# Altium PCB PCB1.PcbDoc
Units mil, origin at the board's own origin, x right, y up, seen from the top; angles counter-clockwise.
Board outline 2795 x 2930 mil, 2 copper layers (Top Layer, Bottom Layer); 38 components, 23 nets, 145 pads, 17 vias.
Unrouted connection lines stored in the file: 10.
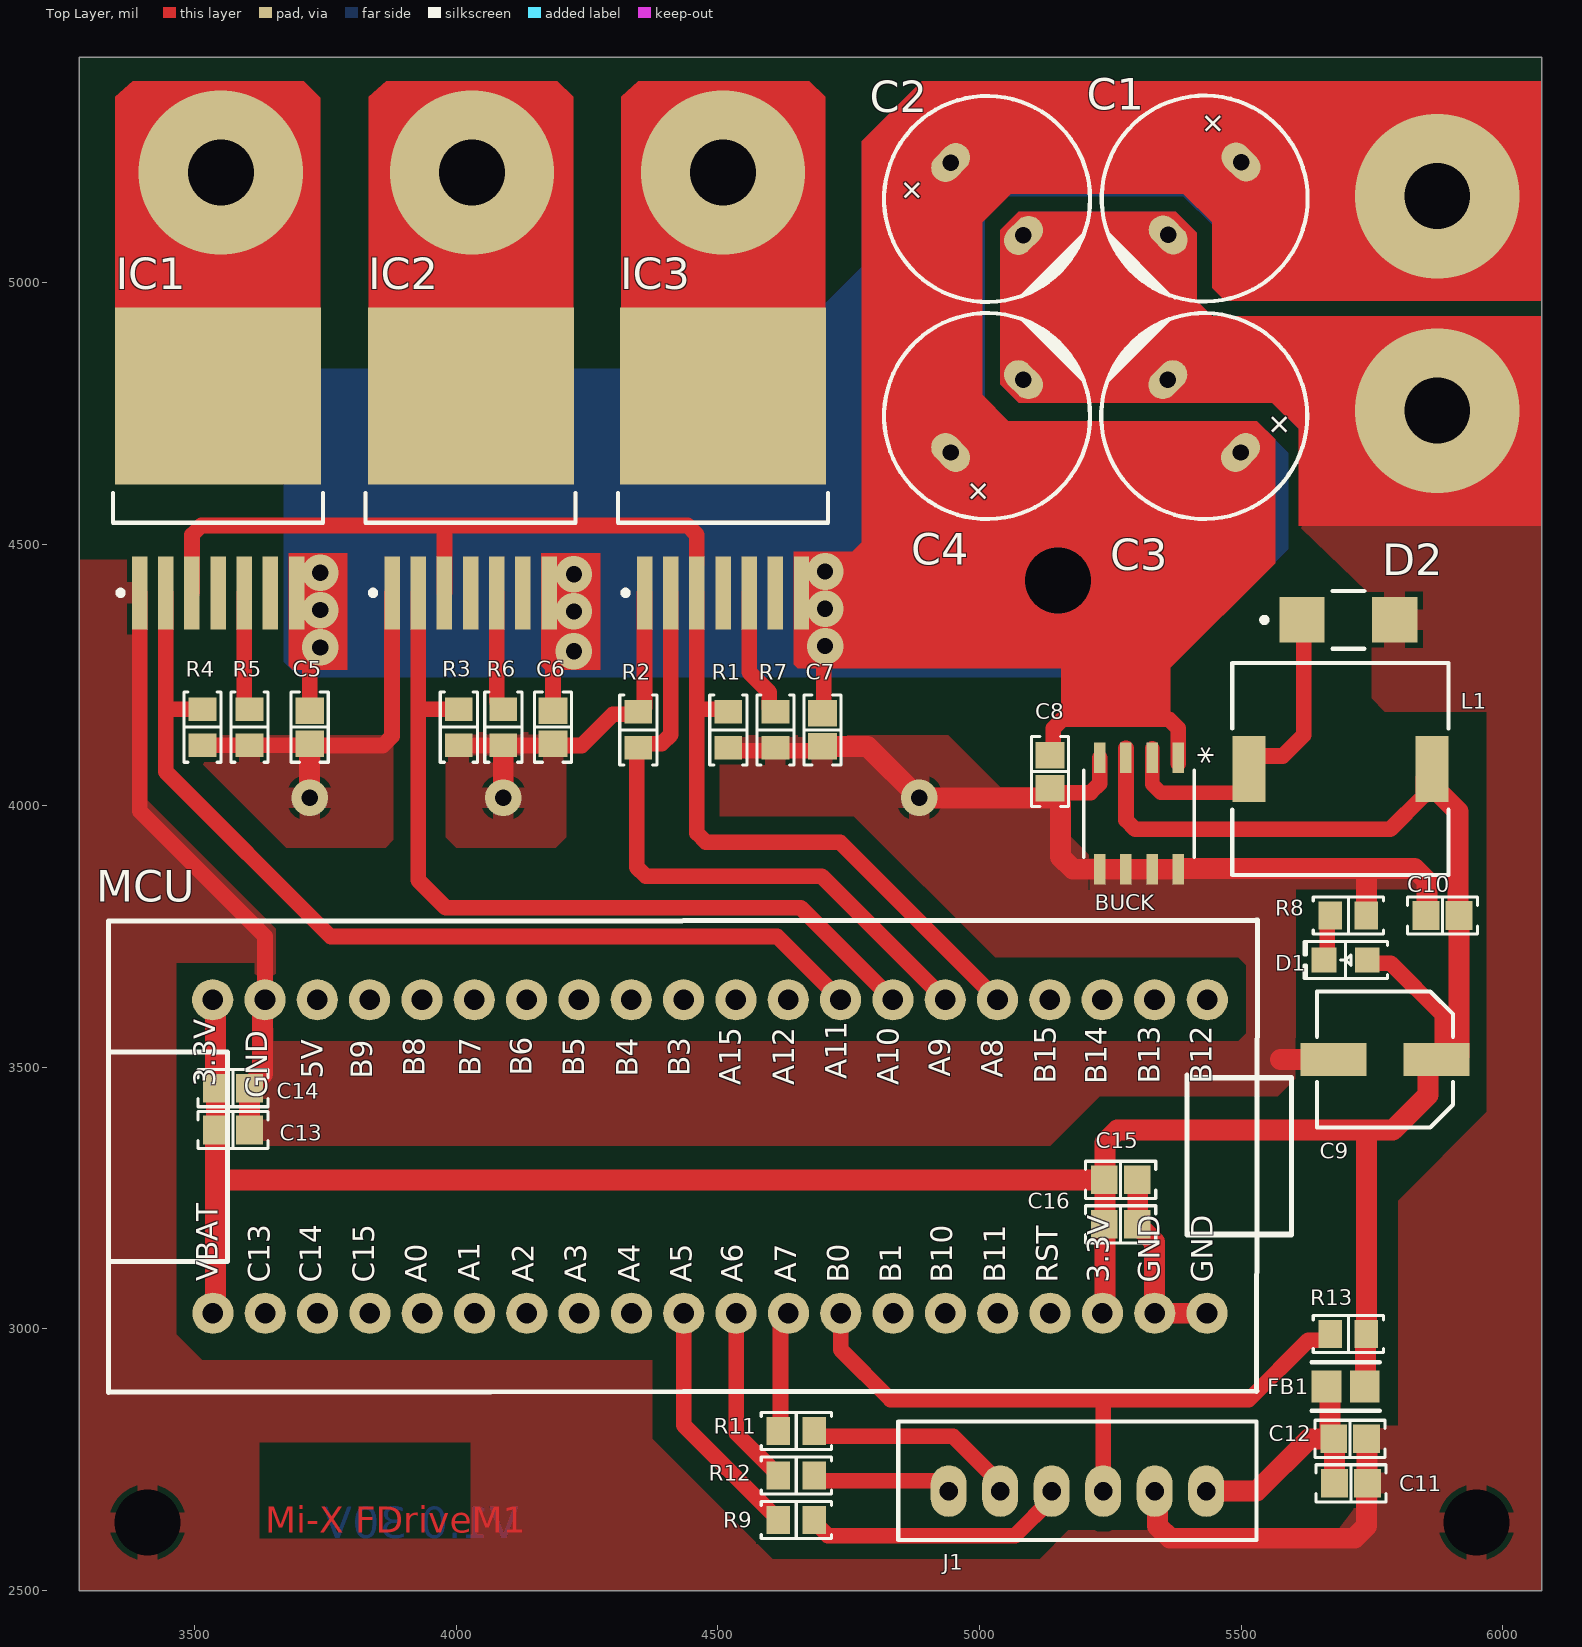
[diagram p0: Top Layer view]
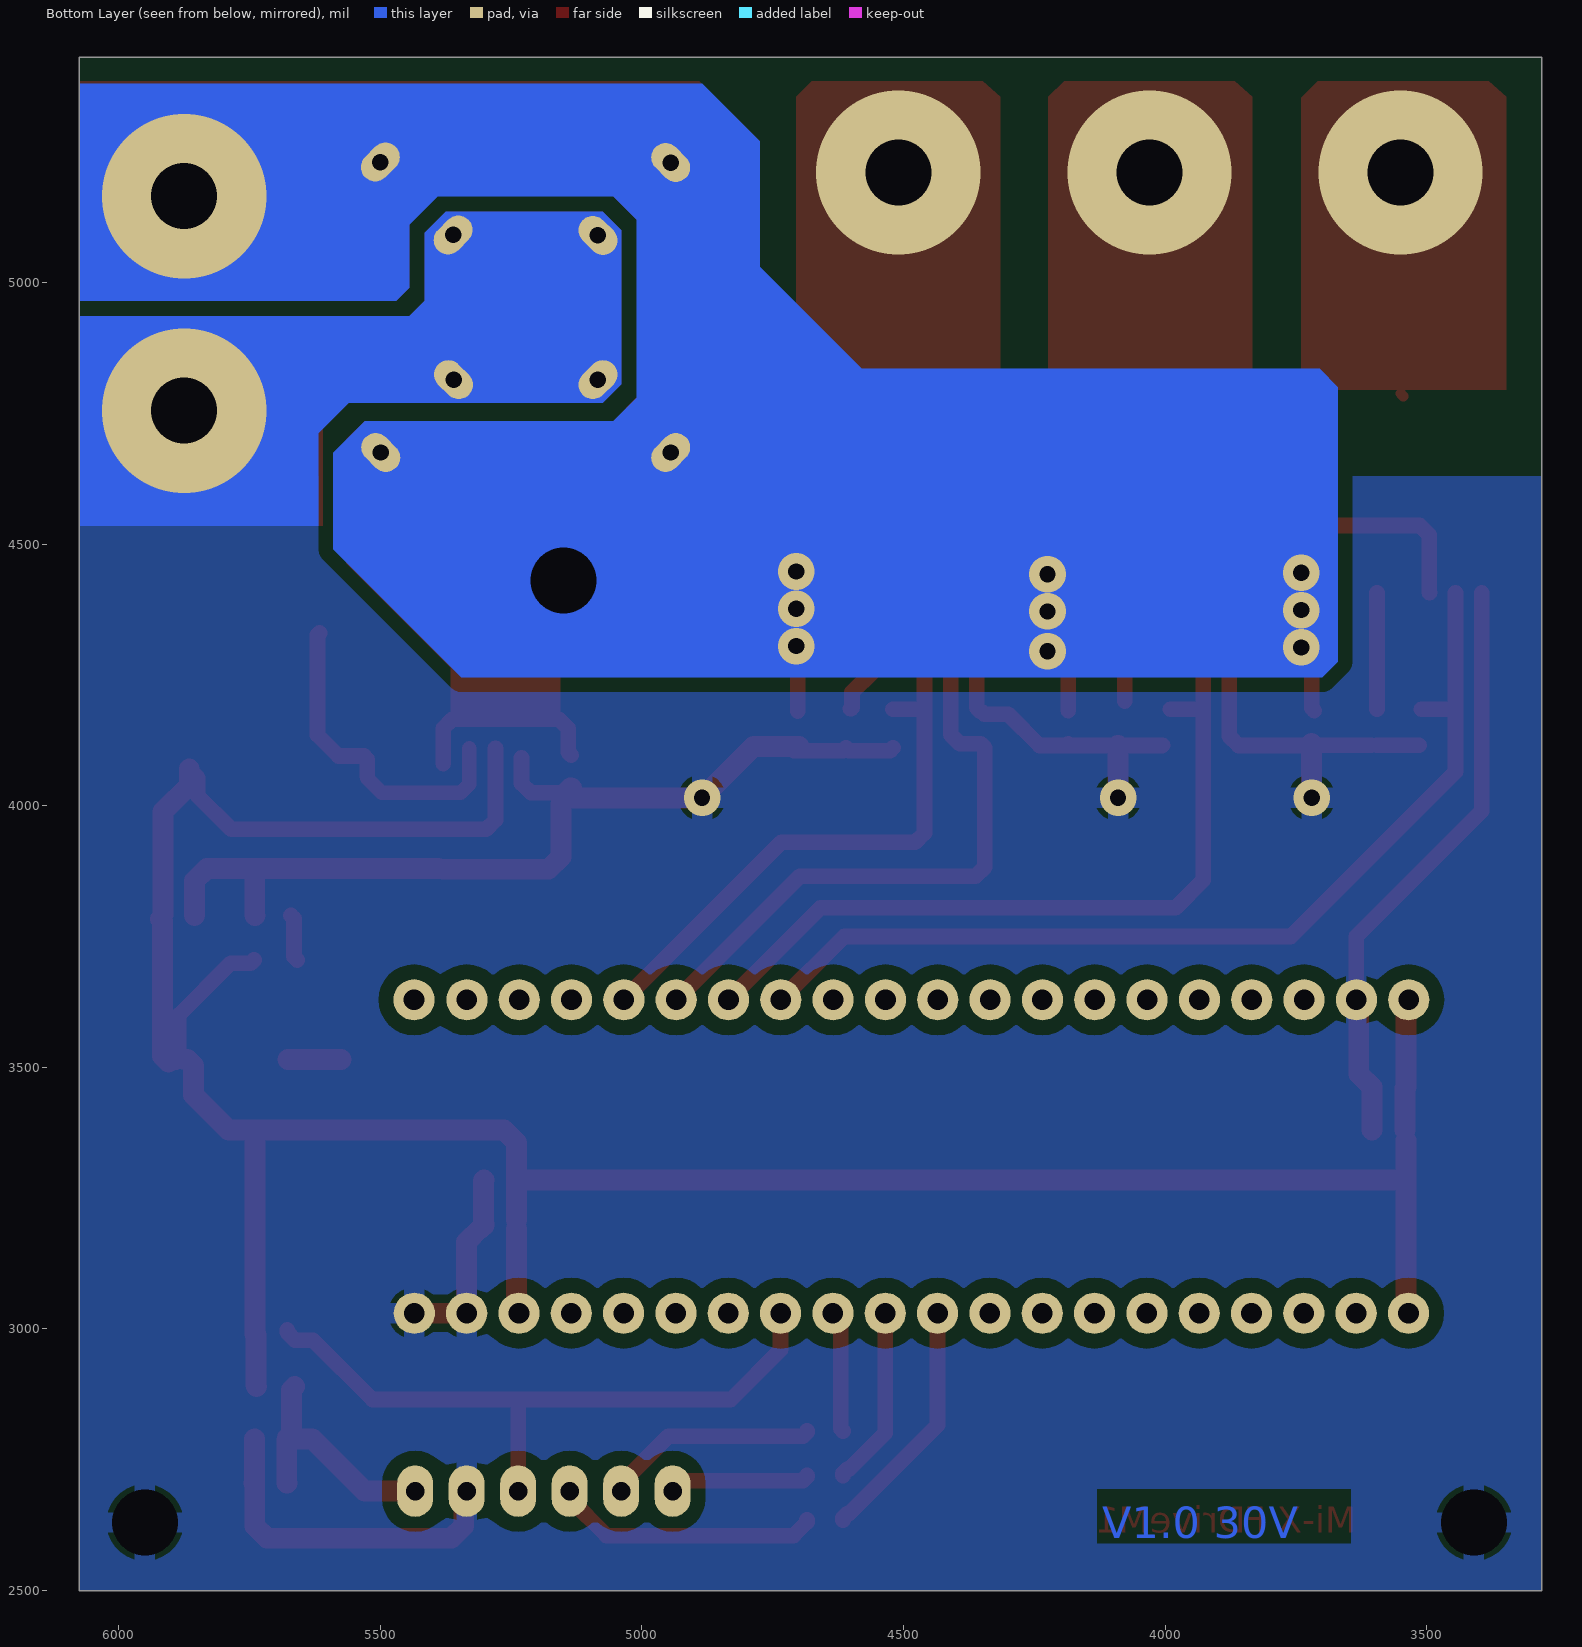
[diagram p1: Bottom Layer view, seen from below]
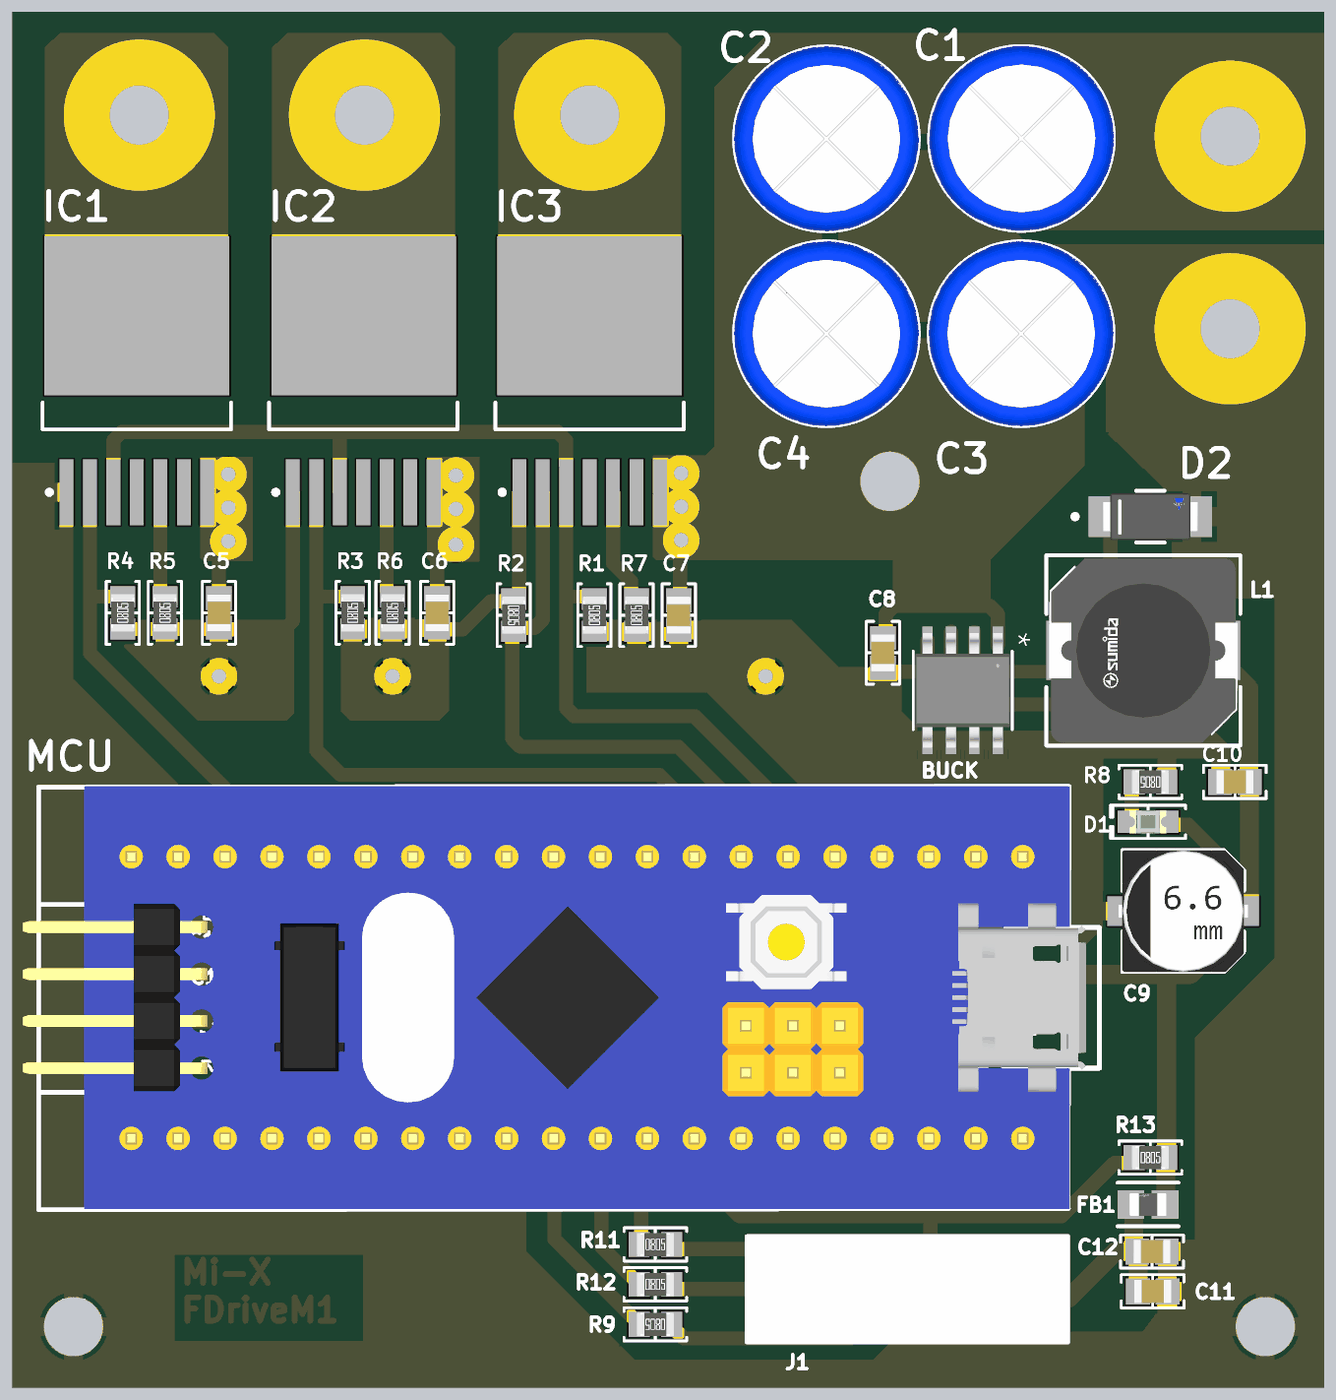
[diagram p2: 3D render of the assembled board from above, using the file's embedded part models]

## Layer stack, top to bottom
Top Solder: solder mask 0.4, Solder Resist, Dk 3.5
Top Layer: signal copper 1.4
Dielectric 1: dielectric 12.6, FR-4, Dk 4.8
Bottom Layer: signal copper 1.4
Bottom Solder: solder mask 0.4, Solder Resist, Dk 3.5

## Board outline
3280,2500 6075,2500 6075,5430 3280,5430

## Design rules (kind name [scope] priority, off if disabled: settings)
Clearance [All] p1: gap=28 ignorepadtopadclearanceinfootprint=FALSE except(0: Arc-Hole Track-Hole SMDPad-Hole THPad-Hole Via-Hole Fill-Hole Poly-Hole Region-Hole Text-Hole; 10: Arc-SMDPad Arc-THPad Arc-Text Track-SMDPad Track-THPad Track-Text SMDPad-SMDPad SMDPad-THPad SMDPad-Text THPad-THPad THPad-Text Via-Text Fill-Text Poly-Text Region-Text Text-Text; 20: Arc-Arc Arc-Track Arc-Via Track-Track Track-Via SMDPad-Via SMDPad-Fill SMDPad-Poly SMDPad-Region THPad-Via Via-Via)
PolygonConnect [All] p1: connectstyle=Relief reliefconductorwidth=40 reliefentries=4 polygonreliefangle="90 Angle" airgapwidth=10
RoutingVias [All] p1: holewidth=31 width=60 viastyle="Through Hole" minholewidth=30 minwidth=59 maxholewidth=500 maxwidth=500
SolderMaskExpansion [All] p1: expansion=4 istentingtop=FALSE
Width [All] p1: maxlimit=500 minlimit=10 preferedwidth=40
30 further rules are at their usual default settings.

## Components (designator, comment, footprint, x,y, rotation, side; value= is the part's Value field where it differs from the comment)
BUCK "XL1509-ADJ" SOIC-8_YTS 5305,3985 r270 top
C1 "470 µF" "CAP TH ALPOLY D10.00mm S5.00mm H11.50mm" 5430.4,5160.4 r45 top
C2 "470 µF" "CAP TH ALPOLY D10.00mm S5.00mm H11.50mm" 5014.6,5159.6 r135 top
C3 "470 µF" "CAP TH ALPOLY D10.00mm S5.00mm H11.50mm" 5429.6,4744.6 r315 top
C4 "470 µF" "CAP TH ALPOLY D10.00mm S5.00mm H11.50mm" 5014.6,4744.6 r225 top
C5 "10000 pF" "CAP 0805_2012" 3720,4150 r90 top
C6 "10000 pF" "CAP 0805_2012" 4185,4150 r90 top
C7 "10000 pF" "CAP 0805_2012" 4700,4145 r90 top
C8 "10000 pF" "CAP 0805_2012" 5135,4065 r90 top
C9 "100uF" "CAP ALSMD 6.6MM H8.0MM" 5775,3515 r180 top
C10 "100uF" "CAP 0805_2012" 5885,3790 r0 top value="10000 pF"
C11 "10000 pF" "CAP 0805_2012" 5710,2705 r180 top
C12 "10000 pF" "CAP 0805_2012" 5708.5,2790 r180 top
C13 "10000 pF" "CAP 0805_2012" 3573.5,3380 r180 top
C14 "10000 pF" "CAP 0805_2012" 3573.5,3460 r180 top
C15 "10000 pF" "CAP 0805_2012" 5270,3285 r180 top
C16 "10000 pF" "CAP 0805_2012" 5270,3200 r180 top
D1 "Green" "LED 0805_2012 GREEN" 5700,3705 r180 top
D2 "SS26" FP-S8-V-3848_01-003-MFG 5705,4355 r0 top
FB1 "100ohm" FP-BLM21-0_2-t0_85-e0_5-IPC_A 5700,2890 r180 top
IC1 "BTN8982TA" INF-PG-TO263-7-1_L#1 3545,4645 r90 top
IC2 "BTN8982TA" INF-PG-TO263-7-1_L#2 4027.5,4645 r90 top
IC3 "BTN8982TA" INF-PG-TO263-7-1_L#1 4510,4645 r90 top
J1 "Encoder" "JST XH B6B-XH-A" 5187.36,2690 r180 top
L1 "68uH" FP-CDRH104R-MFG 5690,4070 r90 top
MCU "STM32F103C8T6" "Stm32 BluePill" 4258.07,3320.8 r90 top
R1 "10k" "RES 0805_2012" 4520,4145 r90 top
R2 "10k" "RES 0805_2012" 4348,4145 r270 top
R3 "10k" "RES 0805_2012" 4005,4150 r90 top
R4 "10k" "RES 0805_2012" 3515,4150 r90 top
R5 "4.7K" "RES 0805_2012" 3605,4150 r90 top
R6 "4.7K" "RES 0805_2012" 4090,4150 r90 top
R7 "4.7K" "RES 0805_2012" 4610,4145 r90 top
R8 "470R" "RES 0805_2012" 5705,3790 r180 top
R9 "22R" "RES 0805_2012" 4650,2635 r180 top
R11 "22R" "RES 0805_2012" 4650,2805 r0 top
R12 "22R" "RES 0805_2012" 4650,2720 r0 top
R13 "4.7K" "RES 0805_2012" 5705,2990 r0 top

## Footprints (in the part's own frame and the unit in brackets; to place one, negate y for a bottom-side part, rotate by r counter-clockwise, add the part's x,y. Pads: shape width x height; smd on the part's side, far side on the other; paste and mask are expansions set on the pad)
"CAP 0805_2012" [mm] "Chip Capacitor, 2-Leads, Body 2.00x1.20mm, IPC Medium Density"
  rect 1.3x1.4 smd: 1(-0.8,0) 2(0.8,0)
  silkscreen extent -1.7,-0.9 1.7,0.9, body extent -1,-0.64 1,0.64, height 1.26
"CAP ALSMD 6.6MM H8.0MM" [mm] "Aluminum Electrolytic Capacitor, Body 6.60x6.60x8.0mm, IPC Low Density"
  rect 3.2x1.6 smd: 1(-2.5,0) 2(2.5,0)
  silkscreen extent -3.3,-3.3 3.3,3.3, body extent -3.5,-3.3 3.5,3.3, height 8
"CAP TH ALPOLY D10.00mm S5.00mm H11.50mm" [mm] "10.00mm Diameter 11.50mm Lead Spacing Aluminum - Polymer Capacitors Radial, Can"
  oval 1.4x2.1 hole 0.8: 1(2.5,0) 2(-2.5,0)
  silkscreen extent -5,-5 5,5, body extent -5.01,-5 5,5, height 11.5
FP-BLM21-0_2-t0_85-e0_5-IPC_A [mil]
  rect 57.28x61.27 smd paste+0 mask+0: 1(-36.44,0) 2(36.44,0)
  silkscreen extent -65,-46 65,46, body extent -85,-50 85,50, height 10
FP-CDRH104R-MFG [mm]
  rect 3.2x1.6 smd paste+0 mask+0: 1(0,4.45) 2(0,-4.45)
  silkscreen extent -5.15,-5.25 5.15,5.25, body extent -5.25,-5.35 5.25,5.35, height 0.25
FP-S8-V-3848_01-003-MFG [mm]
  rect 2.2x2.21 smd paste+0 mask+0: 1(-2.25,0) 2(2.25,0)
  silkscreen extent -4.2,-1.4 0.77,1.4, body extent -3.45,-1.5 3.45,1.5, height 0.25
INF-PG-TO263-7-1_L#1 [mm] "DPAK, 8-Leads, Body 10x9.25mm, Pitch 1.27mm, IPC High Density"
  rect 3.55x0.75 smd: 1(-6.05,3.81) 2(-6.05,2.54) 3(-6.05,1.27) 4(-6.05,0) 5(-6.05,-1.27) 6(-6.05,-2.54) 7(-6.05,-3.81)
  rect 8.6x10 smd: 8(3.5,0)
  silkscreen extent -6.17,-5.1 -1.2,5.1, body extent -2.65,-5.1 6.8,5.1, height 4.4
INF-PG-TO263-7-1_L#2 [mm] "DPAK, 8-Leads, Body 10x9.25mm, Pitch 1.27mm, IPC High Density"
  rect 3.55x0.75 smd: 1(-6.05,3.81) 2(-6.05,2.54) 3(-6.05,1.27) 4(-6.05,0) 5(-6.05,-1.27) 6(-6.05,-2.54) 7(-6.05,-3.81)
  rect 8.6x10 smd: 8(3.5,-0.025)
  silkscreen extent -6.17,-5.1 -1.2,5.1, body extent -2.65,-5.1 6.8,5.1, height 4.4
"JST XH B6B-XH-A" [mm]
  oval 1.75x2.5 hole 0.9: 1(-6.25,0) 2(-3.75,0) 3(-1.25,0) 4(1.25,0) 5(3.75,0) 6(6.25,0)
  silkscreen extent -8.7,-3.38 8.7,2.38, body extent -8.7,-3.38 8.7,2.38, height 7
"LED 0805_2012 GREEN" [mm] "Chip Diode, 2-Leads, Body 2.00x1.25mm, IPC Medium Density"
  rect 1.2x1.2 smd: 1(-1.05,0) 2(1.05,0)
  silkscreen extent -2.03,-0.9 2.03,0.9, body extent -1,-0.62 1,0.63, height 0.9
"RES 0805_2012" [mm] "Chip Resistor, 2-Leads, Body 2.00x1.25mm, IPC Medium Density"
  rect 1.15x1.35 smd: 1(-0.875,0) 2(0.875,0)
  silkscreen extent -1.7,-0.9 1.7,0.9, body extent -1,-0.62 1,0.63, height 0.6
SOIC-8_YTS [mil]
  rect 59x22 smd paste+0 mask+0: 1(-106.5,75) 2(-106.5,25) 3(-106.5,-25) 4(-106.5,-75) 5(106.5,-75) 6(106.5,-25) 7(106.5,25) 8(106.5,75)
  silkscreen extent -84,-106 84,106, body extent -122,-101 122,101, height 69
"Stm32 BluePill" [mm]
  round 2 hole 1: 1(7.828,-29.909) 2(7.828,-27.343) 3(7.828,-24.803) 4(7.828,-22.263) 5(7.828,-19.723) 6(7.828,-17.183) 7(7.828,-14.643) 8(7.828,-12.103) 9(7.828,-9.563) 10(7.828,-7.023) 11(7.828,-4.483) 12(7.828,-1.943) 13(7.828,0.597) 14(7.828,3.137) 15(7.828,5.677) 16(7.828,8.217) 17(7.828,10.757) 18(7.828,13.297) 19(7.828,15.837) 20(7.828,18.377) 21(-7.386,18.366) 22(-7.386,15.826) 23(-7.386,13.286) 24(-7.386,10.746) 25(-7.386,8.206) 26(-7.386,5.666) 27(-7.386,3.126) 28(-7.386,0.586) 29(-7.386,-1.954) 30(-7.386,-4.494) 31(-7.386,-7.034) 32(-7.386,-9.574) 33(-7.386,-12.114) 34(-7.386,-14.654) 35(-7.386,-17.194) 36(-7.386,-19.734) 37(-7.386,-22.274) 38(-7.386,-24.814) 39(-7.386,-27.354) 40(-7.386,-29.894)
  silkscreen extent -11.22,-34 11.69,23.43, body extent -11.18,-33.27 11.68,24.29, height 12.31

## Part data
BUCK: "Description", Manufacturer_Name="UMW(Youtai Semiconductor Co., Ltd.)", Copyright="Copyright (C) 2026 Ultra Librarian. All rights reserved.", Manufacturer_Part_Number=XL1509-ADJ, RefDes=RefDes, Type=Type
C1 C2 C3 C4: library part APSC160ELL471MJB5S, "CAP ALUM POLY 470UF 20% 16V T/H", Device Package="Radial, Can", ESR (Equivalent Series Resistance)=10mOhm, Lifetime @ Temp.="2000 Hrs @ 105°C", Manufacturer="United Chemi-Con", Operating Temperature="-55°C ~ 105°C", Ripple Current @ High Frequency="6.1 A @ 100 kHz", Supplier Part Number 1=565-3234-ND, Tolerance=±20%, Voltage - Rated="16 V", Applications="General Purpose", Capacitance="470 µF", ComponentLink1Description=Datasheet, ComponentLink1URL=http://www.chemi-con.co.jp/cgi-bin/CAT_DB/SEARCH/cat_db_al.cgi?e=e&j=p&pdfname=psc, ComponentLink2Description="DigiKey Link", ComponentLink2URL=https://www.digikey.com/en/products/detail/united-chemi-con/APSC160ELL471MJB5S/1826698, Height - Seated (Max)="0.453\" (11.50mm)", lastupdated="4/5/2026 21:04:37", Lead Spacing="0.197\" (5.00mm)", Lifecycle Status=Active, Minimum Order=1, Mounting Type="Through Hole", Package / Case="Radial, Can", packaging=Bulk, Part Number=APSC160ELL471MJB5S, Part Status=Active, partid=3587, price=0.89, series=NPCAP™-PSC, Size / Dimension="0.394\" Dia (10.00mm)", Supplier 1=DigiKey, Type=Polymer
C5 C6 C7 C11 C13 C15: library part C0805C103K5RACTU, "CAP CER 10000PF 50V X7R 0805", Capacitance=100nF, Device Package="0805 (2012 Metric)", Manufacturer=KEMET, Operating Temperature="-55°C ~ 125°C", Supplier Part Number 1=399-C0805C103K5RACTUCT-ND, Temperature Coefficient=X7R, Tolerance=±10%, Voltage - Rated=50V, Applications="Bypass, Decoupling", ComponentLink1Description=Datasheet, ComponentLink1URL=https://api.kemet.com/component-edge/download/datasheet/C0805C103K5RACTU.pdf, ComponentLink2Description="DigiKey Link", ComponentLink2URL=https://www.digikey.com/en/products/detail/kemet/C0805C103K5RACTU/411157, lastupdated="4/6/2026 19:33:13", Lifecycle Status=Active, Minimum Order=1, Mounting Type="Surface Mount, MLCC", Package / Case="0805 (2012 Metric)", packaging=TapeAndReel, Part Number=C0805C103K5RACTU, Part Status=Active, partid=74789, price=0.01, series="SMD Comm X7R", Size / Dimension="0.079\" L x 0.049\" W (2.00mm x 1.25mm)", Supplier 1=DigiKey, Thickness (Max)="0.035\" (0.88mm)"
C8 C10: library part C0805C103K5RACTU, "CAP CER 10000PF 50V X7R 0805", Capacitance=1uF, Device Package="0805 (2012 Metric)", Manufacturer=KEMET, Operating Temperature="-55°C ~ 125°C", Supplier Part Number 1=399-C0805C103K5RACTUCT-ND, Temperature Coefficient=X7R, Tolerance=±10%, Voltage - Rated=50V, Applications="Bypass, Decoupling", ComponentLink1Description=Datasheet, ComponentLink1URL=https://api.kemet.com/component-edge/download/datasheet/C0805C103K5RACTU.pdf, ComponentLink2Description="DigiKey Link", ComponentLink2URL=https://www.digikey.com/en/products/detail/kemet/C0805C103K5RACTU/411157, lastupdated="4/6/2026 19:33:13", Lifecycle Status=Active, Minimum Order=1, Mounting Type="Surface Mount, MLCC", Package / Case="0805 (2012 Metric)", packaging=TapeAndReel, Part Number=C0805C103K5RACTU, Part Status=Active, partid=74789, price=0.01, series="SMD Comm X7R", Size / Dimension="0.079\" L x 0.049\" W (2.00mm x 1.25mm)", Supplier 1=DigiKey, Thickness (Max)="0.035\" (0.88mm)"
C9: library part EHBSA035M1010608T, "CAP ALUM HYBRID 0608 35V 100UF", Part Number=EHBSA035M1010608T
C12 C14 C16: library part C0805C103K5RACTU, "CAP CER 10000PF 50V X7R 0805", Capacitance=10uF, Device Package="0805 (2012 Metric)", Manufacturer=KEMET, Operating Temperature="-55°C ~ 125°C", Supplier Part Number 1=399-C0805C103K5RACTUCT-ND, Temperature Coefficient=X7R, Tolerance=±10%, Voltage - Rated=50V, Applications="Bypass, Decoupling", ComponentLink1Description=Datasheet, ComponentLink1URL=https://api.kemet.com/component-edge/download/datasheet/C0805C103K5RACTU.pdf, ComponentLink2Description="DigiKey Link", ComponentLink2URL=https://www.digikey.com/en/products/detail/kemet/C0805C103K5RACTU/411157, lastupdated="4/6/2026 19:33:13", Lifecycle Status=Active, Minimum Order=1, Mounting Type="Surface Mount, MLCC", Package / Case="0805 (2012 Metric)", packaging=TapeAndReel, Part Number=C0805C103K5RACTU, Part Status=Active, partid=74789, price=0.01, series="SMD Comm X7R", Size / Dimension="0.079\" L x 0.049\" W (2.00mm x 1.25mm)", Supplier 1=DigiKey, Thickness (Max)="0.035\" (0.88mm)"
D1: library part QTLP630C4TR, "LED GREEN CLEAR 0805 SMD", Current - Test=20mA, Device Package="0805 (2012 Metric)", Lens Color=Colorless, Manufacturer="Everlight Electronics Co Ltd", Millicandela Rating=10mcd, Supplier Device Package=0805, Supplier Part Number 1=1080-1411-1-ND, Voltage - Forward (Vf) (Typ)=2.1V, Color=Green, ComponentLink1Description=Datasheet, ComponentLink1URL=//media.digikey.com/PDF/Data%20Sheets/Everlight%20PDFs/QTLP630-2.pdf, ComponentLink2Description="DigiKey Link", ComponentLink2URL=https://www.digikey.com/en/products/detail/everlight-electronics-co-ltd/QTLP630C4TR/2675902, Configuration=Standard, Height (Max)=1.20mm, lastupdated="4/5/2026 20:39:04", Lens Size="1.40mm x 1.25mm", Lens Style="Rectangle with Flat Top", Lens Transparency=Clear, Lifecycle Status=Active, Minimum Order=1, Mounting Type="Surface Mount", Package / Case="0805 (2012 Metric)", packaging=TapeAndReel, Part Number=QTLP630C4TR, Part Status=Active, partid=240, price=0.05, series=-, Size / Dimension="2.00mm L x 1.25mm W", Supplier 1=DigiKey, Viewing Angle=140°, Wavelength - Dominant=570nm, Wavelength - Peak=565nm
D2: library part CMP-02539-000064-1, "DIODE SCHOTTKY 60V 2A DO214AC", RoHS Compliant=Yes
FB1: library part CMP-06046-002791-1, "Chip Ferrite Bead, 0805, 420Ω @ 100MHz, 0.3Ω, 25%, 300mA"
IC1 IC2 IC3: library part CMP-1114-00014-1, "High Current PN Half Bridge, 5.5 to 40 V, 7 uA Iq, PG-TO263-7, Reel, Green", Manufacturer=Infineon, Operating Range="5.5 to 40 V", ComponentLink1Description="Manufacturer URL", ComponentLink1URL=http://www.infineon.com/, ComponentLink2Description=Datasheet, ComponentLink2URL=http://www.infineon.com/dgdl/BTN8982TA-Data-Sheet-rev10-Infineon.pdf?folderId=db3a30431ff98815012060aedcd46179&fileId=db3a30433fa9412f013fbe32289b7c17, ComponentLink3Description="Package Specification", ComponentLink3URL=http://www.infineon.com/dgdl/BTN8982TA-Data-Sheet-rev10-Infineon.pdf?folderId=db3a30431ff98815012060aedcd46179&fileId=db3a30433fa9412f013fbe32289b7c17&ack=t, DatasheetVersion="Rev. 1.0", Diagnosis="OT, OC-failure flag, current sense", Green=TRUE, Group=NovalithIC, Halogen-free=TRUE, ID(lim)="77 A", ID(lim) (min)="55 A", Inhibit=TRUE, Iq (typ)="7 uA", Mounting=SMT, Mounting Technology="Surface Mount", PackageDescription="7-Pin Plastic (Green) Transistor Single Outline Package, 9.25 x 10 mm Body, 1.27 mm Pitch", PackageReference=PG-TO263-7-1, PackageVersion=May-07, Packing=Reel, PartNumber=BTN8982TA, Protect="UV, OT, OC", RDS (on)=10
J1: library part B6B-XH-A(LF)(SN), "CONN HEADER VERT 6POS 2.5MM", Current Rating (Amps)=3A, Insulation Color=Natural, Manufacturer="JST Sales America Inc.", Material Flammability Rating="UL94 V-0", Operating Temperature="-25°C ~ 85°C", Supplier Part Number 1=455-2271-ND, Voltage Rating=250V, ComponentLink1Description=Datasheet, ComponentLink1URL=http://www.jst-mfg.com/product/pdf/eng/eXH.pdf, ComponentLink2Description="DigiKey Link", ComponentLink2URL=http://digikey.com/product-detail/en/jst-sales-america-inc/B6B-XH-A-LF-SN/455-2271-ND/1000381, Connector Type=Header, Contact Finish - Mating=Tin, Contact Finish - Post=Tin, Contact Length - Post="0.134\" (3.40mm)", Contact Material=Brass, Contact Shape=Square, Contact Type="Male Pin", Fastening Type="Detent Lock", Insulation Height="0.276\" (7.00mm)", Insulation Material="Polyamide (PA66), Nylon 6/6", lastupdated="1/12/2020 23:46:58", Lifecycle Status=Active, Minimum Order=1, Mounting Type="Through Hole", Number of Positions=6, Number of Positions Loaded=All, Number of Rows=1, packaging=Bulk, Part Number=B6B-XH-A(LF)(SN), Part Status=Active, partid=71, Pitch - Mating="0.098\" (2.50mm)", price=0.27, series=XH, Shrouding="Shrouded - 4 Wall", Style="Board to Cable/Wire", Supplier 1=DigiKey, Termination="Press-Fit, Solder"
L1: library part CMP-48855-000006-1, "FIXED IND 5.2UH 6A 22 MOHM SMD", Case/Package=Nonstandard, Current Rating=5.4A, DC Resistance (DCR)=22mR, Inductance=5.2uH, Max Operating Temperature=100°C, Min Operating Temperature=-40°C, Package Quantity=1, Rated Current-Max=5.5A, Saturation Current=5.6A, Test Frequency=100kHz, Tolerance=30%, Core Material=Ferrite, DC Current=5.4A, Depth=10.3mm, Height=4mm, Height - Seated (Max)=0.157inch, Lead Free="Lead Free", Length=10.5mm, Max DC Current=5.4A, Military Standard=Not, Mount="Surface Mount", packaging="Tape and Reel", Radiation Hardening=No, series=CDRH, Shielding=Shielded, Termination=SMD/SMT, Width=0.394inch
MCU: library part BluePill, "Designed By @Alixahedi"
R1 R2 R3 R4 R5 R6 R7 R8 R9 R11 R12 R13: library part CRGP0805F470R, "RES 470 OHM 1% 1/3W 0805", Part Number=CRGP0805F470R

## Free pads (board coordinates)
  round 60 hole 126: 4(3410,2630) 4(5150,4430) 4(5950,2630)

## Via types
v1: diameter 70, hole 31, Top Layer to Bottom Layer, 12 vias
v2: diameter 314, hole 126, Top Layer to Bottom Layer, 5 vias

## Nets (pads, with @x,y where several pads share a name; then routed paths per layer and width w, separated by ;. In a path a pad name is that pad's centre, name@x,y a point inside that pad or via, vN(x,y) a via of type N, cw(c..) or ccw(c..) an arc to the next point about the centre after c; other vN are vias at no path point)
3.3FLT: C11.2 C12.2 FB1.2 J1.1 | length 476.5
  Top Layer w40: J1.1 5530,2690 5630,2790 C12.2 ; FB1.2 5670,2883.56 5670,2798.98 5677.01,2791.97 C12.2 ; C11.2 5678.82,2705.32 5678.82,2788.19 C12.2
CSN: J1.3 MCU.33 R13.1 | length 1548.6
  Top Layer w30: MCU.33 4735,2960 4830,2865 5236.57,2865 ; J1.3 5236.57,2850 ; R13.1@5678.1,2998.1 5678.1,2993.61 5662.91,2978.43 5628.43,2978.43 5515,2865 ; 5236.57,2865 5500,2865 5515,2865 ; 5236.57,2865 5515,2865
EN: IC1.3 IC2.3 IC3.3 MCU.5 R1.2 | length 2504.3
  Top Layer w30: IC1.3 3495.24,4407.05 3495.24,4517.43 3513.31,4535.5 3969.5,4535.5 ; IC2.3 3977.5,4527.5 3969.5,4535.5 ; IC3.3 4460,4184.45 ; IC3.3@4460,4461.46 4459.76,4461.69 4459.76,4517.93 4442.19,4535.5 3969.5,4535.5 ; R1.2@4520,4184.45 4460,4184.45 ; MCU.5 4733.57,3930 4477.57,3930 4460,3947.57 4460,4184.45
GND: BUCK.4 BUCK.5 BUCK.6 BUCK.7 BUCK.8 C1.2 C2.2 C3.2 C4.2 C5.1 C6.1 C7.1 C8.1 C9.2 C10.1 C11.1 C12.1 C13.1 C14.1 C15.1 C16.1 D2.2 IC1.1 IC2.1 IC3.1 J1.2 MCU.19 MCU.39 MCU.40 pad.4@3410,2630 pad.4@5950,2630 R1.1 R2.1 R3.1 R4.1 R5.1 R6.1 R7.1 R8.1 | length 5534.1
  Top Layer w30: IC1.1 3395,3990 3634.57,3750.43 MCU.19 ; R4.1 R5.1@3595,4115.55 ; R5.1 C5.1@3720,4115.55 ; C5.1 3723.5,4115 3859.93,4115 3877.5,4132.57 IC2.1 ; R3.1 4005.55,4115 4089.45,4115 R6.1 4090.55,4115 4181.5,4115 C6.1 4188.5,4115 4240,4115 4299.8,4174.8 4345.35,4174.8 R2.1@4350,4179.45 ; R2.1@4352.36,4179.45 4360,4187.09 IC3.1 ; R1.1 4525.55,4105 4604.45,4105 R7.1 4615.55,4105 C7.1@4710,4105 ; C8.1@5136.97,4033.5 5142.56,4027.91 5145.47,4025 5212.43,4025 5230,4042.57 BUCK.4
  Top Layer w40: C13.1 C14.1 3605,3461.97 3630,3486.97 3630,3624.43 MCU.19 ; v1(3720,4015) 3720,4115.55 C5.1 ; v1(4090,4015) R6.1 ; C7.1 4786.5,4113.5 v1(4885,4015) C8.1@5131.97,4015 ; C8.1 C8.1@5136.97,4033.5 ; C8.1@5142.56,4027.91 5142.56,4016.92 5155,4004.48 5155,3901.93 5178.43,3878.5 BUCK.5 BUCK.6 BUCK.7 BUCK.8 ; C15.1 5302.56,3283.93 5302.56,3201.07 C16.1 5301.5,3198.03 5307.09,3192.44 5309.06,3192.44 5335,3166.5 MCU.39 MCU.40 ; J1.2 5340.53,2684.47 5340.53,2623.43 5363.96,2600 5716.57,2600 5740,2623.43 5740,2703.5 C11.1 5740.75,2705.75 5740.75,2789.25 C12.1 ; BUCK.8@5389,3880 5740,3880 ; 5575.28,3515 C9.2 ; R8.1 5740,3790.55 5740,3880 ; C10.1@5855,3790 5855,3856.57 5831.57,3880 5740,3880
  other v2: 5875,4755
IN1: IC1.2 MCU.8 R4.2 | length 1877
  Top Layer w30: IC1.2 3445,4184.45 ; R4.2@3510,4184.45 3445,4184.45 ; MCU.8 4613.57,3750 3760,3750 3445,4065 3445,4184.45
IN2: IC2.2 MCU.7 R3.2 | length 1615.8
  Top Layer w30: IC2.2 3927.5,4190 ; R3.2@3990,4184.45 3933.05,4184.45 3927.5,4190 ; MCU.7 4658.57,3805 3980,3805 3927.5,3857.5 3927.5,4190
IN3: IC3.2 MCU.6 R2.2 | length 1269.1
  Top Layer w30: IC3.2 4410,4135.76 4392.43,4118.19 4352.64,4118.19 4345,4110.55 4345,3882.57 4362.57,3865 4698.57,3865 MCU.6
MISO: MCU.31 R12.1 | length 345.4
  Top Layer w30: MCU.31 4535,2800.98 4604.41,2731.57 4607.91,2731.57 4615.55,2723.94 R12.1
MOSI: MCU.32 R11.1 | length 233.1
  Top Layer w30: R11.1 4620,2809.45 4620,3001.81 4635,3016.81 MCU.32
NetBUCK_2: BUCK.2 D2.1 L1.1 | length 628.4
  Top Layer w28: BUCK.2@5330,4110 5330,4041.4 5346.4,4025 5497.31,4025 5524.8,4052.5 L1.1@5524.8,4055.75
  Top Layer w30: L1.1@5524.8,4055.75 5524.8,4088.5 5531.3,4095 5579.8,4095 5620,4135.2 5620,4326.42 D2.1@5616.42,4330
NetD1_2: D1.2 R8.2 | length 89.9
  Top Layer w30: D1.2 5665,3711.34 5665,3784.45 R8.2
NetIC1_4: IC1.4 IC1.8 | length 7.1
  Top Layer w20: IC1.8 IC1.8@3550,4787.8
  other v2: 3550.2,5210.07
NetIC1_5: IC1.5 R5.2 | length 222.4
  Top Layer w30: R5.2@3595,4184.45 IC1.5
NetIC2_4: IC2.4 IC2.8
  other v2: 4030.1,5210.07
NetIC2_5: IC2.5 R6.2 | length 207.5
  Top Layer w30: R6.2@4077.26,4199.45 4077.26,4406.57 IC2.5
NetIC3_4: IC3.4 IC3.8
  other v2: 4510,5210.07
NetIC3_5: IC3.5 R7.2 | length 239.2
  Top Layer w30: IC3.5 4560,4255 4598.43,4216.57 4598.43,4187.09 4600.05,4185.46 R7.2@4601.35,4185.46
NetJ1_4: J1.4 R9.1 | length 512.3
  Top Layer w30: R9.1 4684.45,2631.06 4710.51,2605 5067.91,2605 5138.15,2675.24 J1.4
NetJ1_5: J1.5 R11.2 | length 412.9
  Top Layer w30: R11.2 4684.45,2802.64 4692.09,2795 4949.49,2795 5039.72,2704.76 J1.5
NetJ1_6: J1.6 R12.2 | length 271.9
  Top Layer w30: R12.2 4684.45,2717.64 4692.09,2710 4923.33,2710 4941.3,2692.03 J1.6
SCK: MCU.30 R9.2 | length 471.8
  Top Layer w30: MCU.30 4435,2815.98 4604.41,2646.57 4607.91,2646.57 4615.55,2638.94 R9.2
VCC: BUCK.3 C9.1 C10.2 C13.2 C14.2 C15.2 C16.2 D1.1 FB1.1 L1.2 MCU.20 MCU.21 MCU.38 R13.2 | length 5511.1
  Top Layer w30: 3534.79,3290 3539.79,3285 ; MCU.38 MCU.38@5240,3035 ; C16.2@5240,3191.5 C16.2@5240,3208.5 ; BUCK.3@5280,4110 BUCK.3 5280,3972.57 5297.57,3955 5785,3955 5848.7,4018.7 5848.7,4038.5 5848.7,4053.5 L1.2 ; D1.1 5747.45,3698.89 5786.11,3698.89 5885,3600 5885,3526.57 C9.1 ; C9.1@5879.24,3520.82 5890.06,3510 C9.1@5895,3510
  Top Layer w40: MCU.20 3540,3623.57 3540,3462.01 C14.2 C13.2 ; MCU.21 3539.79,3034.79 3539.79,3285 ; C13.2@3539.79,3360.56 3539.79,3285 ; C15.2@5235.2,3285 3539.79,3285 ; C15.2 5239.94,3286.43 5239.94,3356.57 5263.37,3380 5739.45,3380 5790,3380 5856.94,3446.94 5856.94,3503.5 5868.43,3515 C9.1 ; MCU.38@5240,3035 C16.2@5240,3191.5 ; C16.2@5240,3208.5 C15.2@5240,3279.97 ; FB1.1 5737.94,2891.49 5737.94,2988.49 R13.2 5739.45,3379.45 5740,3380 ; L1.2 5865.2,4053.5 5865.2,4038.5 5915,3988.7 5915,3791.5 C10.2 ; C9.1@5905,3510 5916.5,3521.5 5916.5,3780 C10.2@5920,3783.5
VDC: BUCK.1 C1.1 C2.1 C3.1 C4.1 C5.2 C6.2 C7.2 C8.2 IC1.7 IC2.7 IC3.7 pad.4@5150,4430 | length 735.5
  Top Layer w30: C5.2@3715,4181.5 3720,4186.5 3720,4271.68 3740,4291.68 v1(3740,4302.5) ; C6.2 4185,4275 ; v1@4225,4284.18 v1(4225,4295) ; C7.2@4702.5,4180.75 4702.5,4302.5 v1(4705,4305) ; C8.2 5140.86,4102.35 5140.86,4147.43 5158.43,4165 5362.43,4165 5380,4147.43 BUCK.1@5380,4080
  other v1: 4225,4371.25 3740,4373.75 4705,4376.25 4225,4442.5 3740,4445 4705,4447.5
  other v2: 5875,5165
pads on no net: IC1.6 IC2.6 IC3.6 MCU.1 MCU.2 MCU.3 MCU.4 MCU.9 MCU.10 MCU.11 MCU.12 MCU.13 MCU.14 MCU.15 MCU.16 MCU.17 MCU.18 MCU.22 MCU.23 MCU.24 MCU.25 MCU.26 MCU.27 MCU.28 MCU.29 MCU.34 MCU.35 MCU.36 MCU.37

## Polygon pours and split planes (outlines as drawn)
GND on Top Layer "GND_L01_P004" (solid, remove dead copper, pour order 4): 6075,4535 5610,4535 5750,4400 5750,4205 5775,4180 5970,4180 5970,3415 5800,3245 5800,2815 5715,2815 5715,2655 5685,2615 5170,2615 5115,2560 4605,2560 4375,2790 4375,2940 3515,2940 3465,2990 3465,3700 3615,3700 3615,3635 3640,3635 3655,3650 3655,3765 3400,4020 3400,4470 3280,4470 3280,2500 6075,2500
GND on Top Layer "GND_L01_P007" (solid, remove dead copper, pour order 7): 3490,4135 3490,4105 3675,3920 3865,3920 3880,3935 3880,4135
GND on Top Layer "GND_L01_P006" (solid, remove dead copper, pour order 6): 3980,4140 4210,4140 4210,3940 4190,3920 4000,3920 3980,3940
GND on Top Layer "GND_L01_P005" (solid, remove dead copper, pour order 5): 4495,4135 4939.99,4135 5039.99,4035 5165,4035 5165,3950 5220,3895 5840,3895 5840,3845 5835,3840 5605,3840 5605,3480 5570,3445 5230,3445 5135,3350 3610.59,3350 3610.59,3575 3650,3575 3650,3550 5495.01,3550 5510,3564.99 5510,3695 5495,3710 5030,3710 4760,3980 4495,3980
GND on Bottom Layer "GND_L02_P001" (solid, remove dead copper, pour order 1): 6075,4630 3280,4630 3280,2500 6075,2500

## Other copper
Top Layer:
  region net GND: 6075,4935 5445,4935 5415,4965 5415,5095 5375,5135 5075,5135 5040,5100 5040,4805 5075,4770 5560,4770 5610,4720 5610,4535 6075,4535
  region net VDC: 5365,4265 5365,4165 5155.97,4165 5155.97,4265
  region net VDC: 6075,5385 4890,5385 4775,5270 4775,4503 4757,4485 4757,4262.5 5364.06,4262.5 5565,4463.44 5565,4700 5530,4735 5055,4735 5005,4785 5005,5115 5060,5170 5390,5170 5445,5115 5445,4990 5470,4965 6075,4965
  region net VDC: 3680,4482.5 3792,4482.5 3792,4260 3687.5,4260 3680,4267.5
  region net VDC: 4645,4485 4757,4485 4757,4262.5 4652.5,4262.5 4645,4270
  region net VDC: 4163,4482 4275,4482 4275,4259.5 4170.5,4259.5 4163,4267
  region net NetIC1_4: 3348.34,4795 3348.34,5354.57 3381.66,5385 3708.34,5385 3740,5353.34 3740,4795
  region net NetIC3_4: 4315,4795 4315,5354.57 4348.32,5385 4675,5385 4705,5355 4705,4795
  region net NetIC2_4: 3833.34,4795 3833.34,5354.57 3866.66,5385 4193.34,5385 4223.34,5355 4223.34,4795
  text "Mi-X FDriveM1" at 3635,2610 h50
Bottom Layer:
  region net GND: 6075,4935 5445,4935 5415,4965 5415,5095 5375,5135 5075,5135 5040,5100 5040,4805 5075,4770 5560,4770 5618.24,4711.76 5618.24,4535 6075,4535
  region net VDC: 6075,4965 5470,4965 5445,4990 5445,5110 5390,5165 5055,5165 5010,5120 5010,4780 5055,4735 5530,4735 5590,4675 5590,4490 5345,4245 3700,4245 3670,4275 3670,4800 3705,4835 4580,4835 4775,5030 4775,5270 4885,5380 6075,5380
  text "V1.0 30V" at 4120,2600 h60

## Text inside footprints (layer, text, board x,y; h text height)
BUCK: Top Overlay "*" at 5397,4114 h50 r270; Mechanical 13 "*" at 5352.5,4061 h50 r270
C1: Top Overlay "+" at 5452.67,5260.62 h78.74 r45
C2: Top Overlay "+" at 4914.38,5181.87 h78.74 r135
C3: Top Overlay "+" at 5529.82,4722.33 h78.74 r315
C4: Top Overlay "+" at 4992.33,4644.38 h78.74 r225
MCU: Top Overlay "B12" at 5457.07,3468.4 h70 r90; Top Overlay "GND" at 5459.21,3088.1 h70 r90; Top Overlay "B13" at 5358.21,3468.1 h70 r90; Top Overlay "GND" at 5358.21,3088.11 h70 r90; Top Overlay "A1" at 4058.07,3090.8 h70 r90; Top Overlay "A0" at 3957.32,3088 h70 r90; Top Overlay "C14" at 3755.32,3088 h70 r90; Top Overlay "C13" at 3657.32,3088 h70 r90; Top Overlay "C15" at 3856.32,3088 h70 r90; Top Overlay "B6" at 4157.32,3484.2 h70 r90; Top Overlay "B4" at 4360.07,3481.7 h70 r90; Top Overlay "B7" at 4060.08,3483 h70 r90; Top Overlay "B14" at 5257.07,3467.2 h70 r90; Top Overlay "B5" at 4258.32,3483 h70 r90; Top Overlay "VBAT" at 3558.07,3090.87 h70 r90; Top Overlay "A10" at 4859.32,3465.9 h70 r90; Top Overlay "A12" at 4659.07,3465.9 h70 r90; Top Overlay "A15" at 4557.32,3465.9 h70 r90; Top Overlay "A9" at 4957.32,3481.7 h70 r90; Top Overlay "B3" at 4459.32,3483 h70 r90; Top Overlay "A11" at 4760.07,3477.2 h70 r90; Top Overlay "A8" at 5058.32,3480.5 h70 r90; Top Overlay "B15" at 5159.3,3468.42 h70 r90; Top Overlay "3.3V" at 5260.22,3088.1 h70 r90; Top Overlay "B1" at 4864.07,3088 h70 r90; Top Overlay "B0" at 4763.32,3088 h70 r90; Top Overlay "A7" at 4663.07,3088 h70 r90; Top Overlay "A6" at 4561.32,3088 h70 r90; Top Overlay "B11" at 5063.07,3088 h70 r90; Top Overlay "B10" at 4961.32,3088.01 h70 r90; Top Overlay "RST" at 5163.3,3088.03 h70 r90; Top Overlay "A4" at 4364.07,3088 h70 r90; Top Overlay "A3" at 4262.32,3088 h70 r90; Top Overlay "A2" at 4162.07,3088 h70 r90; Top Overlay "A5" at 4463.32,3088 h70 r90; Top Overlay "GND" at 3652.32,3440.8 h70 r90; Top Overlay "3.3V" at 3553.32,3463 h70 r90; Top Overlay "B8" at 3953.32,3483 h70 r90; Top Overlay "B9" at 3853.32,3478 h70 r90; Top Overlay "5V" at 3758.32,3478 h70 r90